# Altium PCB PINTY-FUJI-CARD-PCB-v1.1_2026-11-04.pcbdoc (part 2 of 2)
Units mil, origin at the board's own origin, x right, y up, seen from the top; angles counter-clockwise.
Board outline 3304.99 x 3610.47 mil, 2 copper layers (Top Layer, Bottom Layer); 76 components, 76 nets, 376 pads, 156 vias.
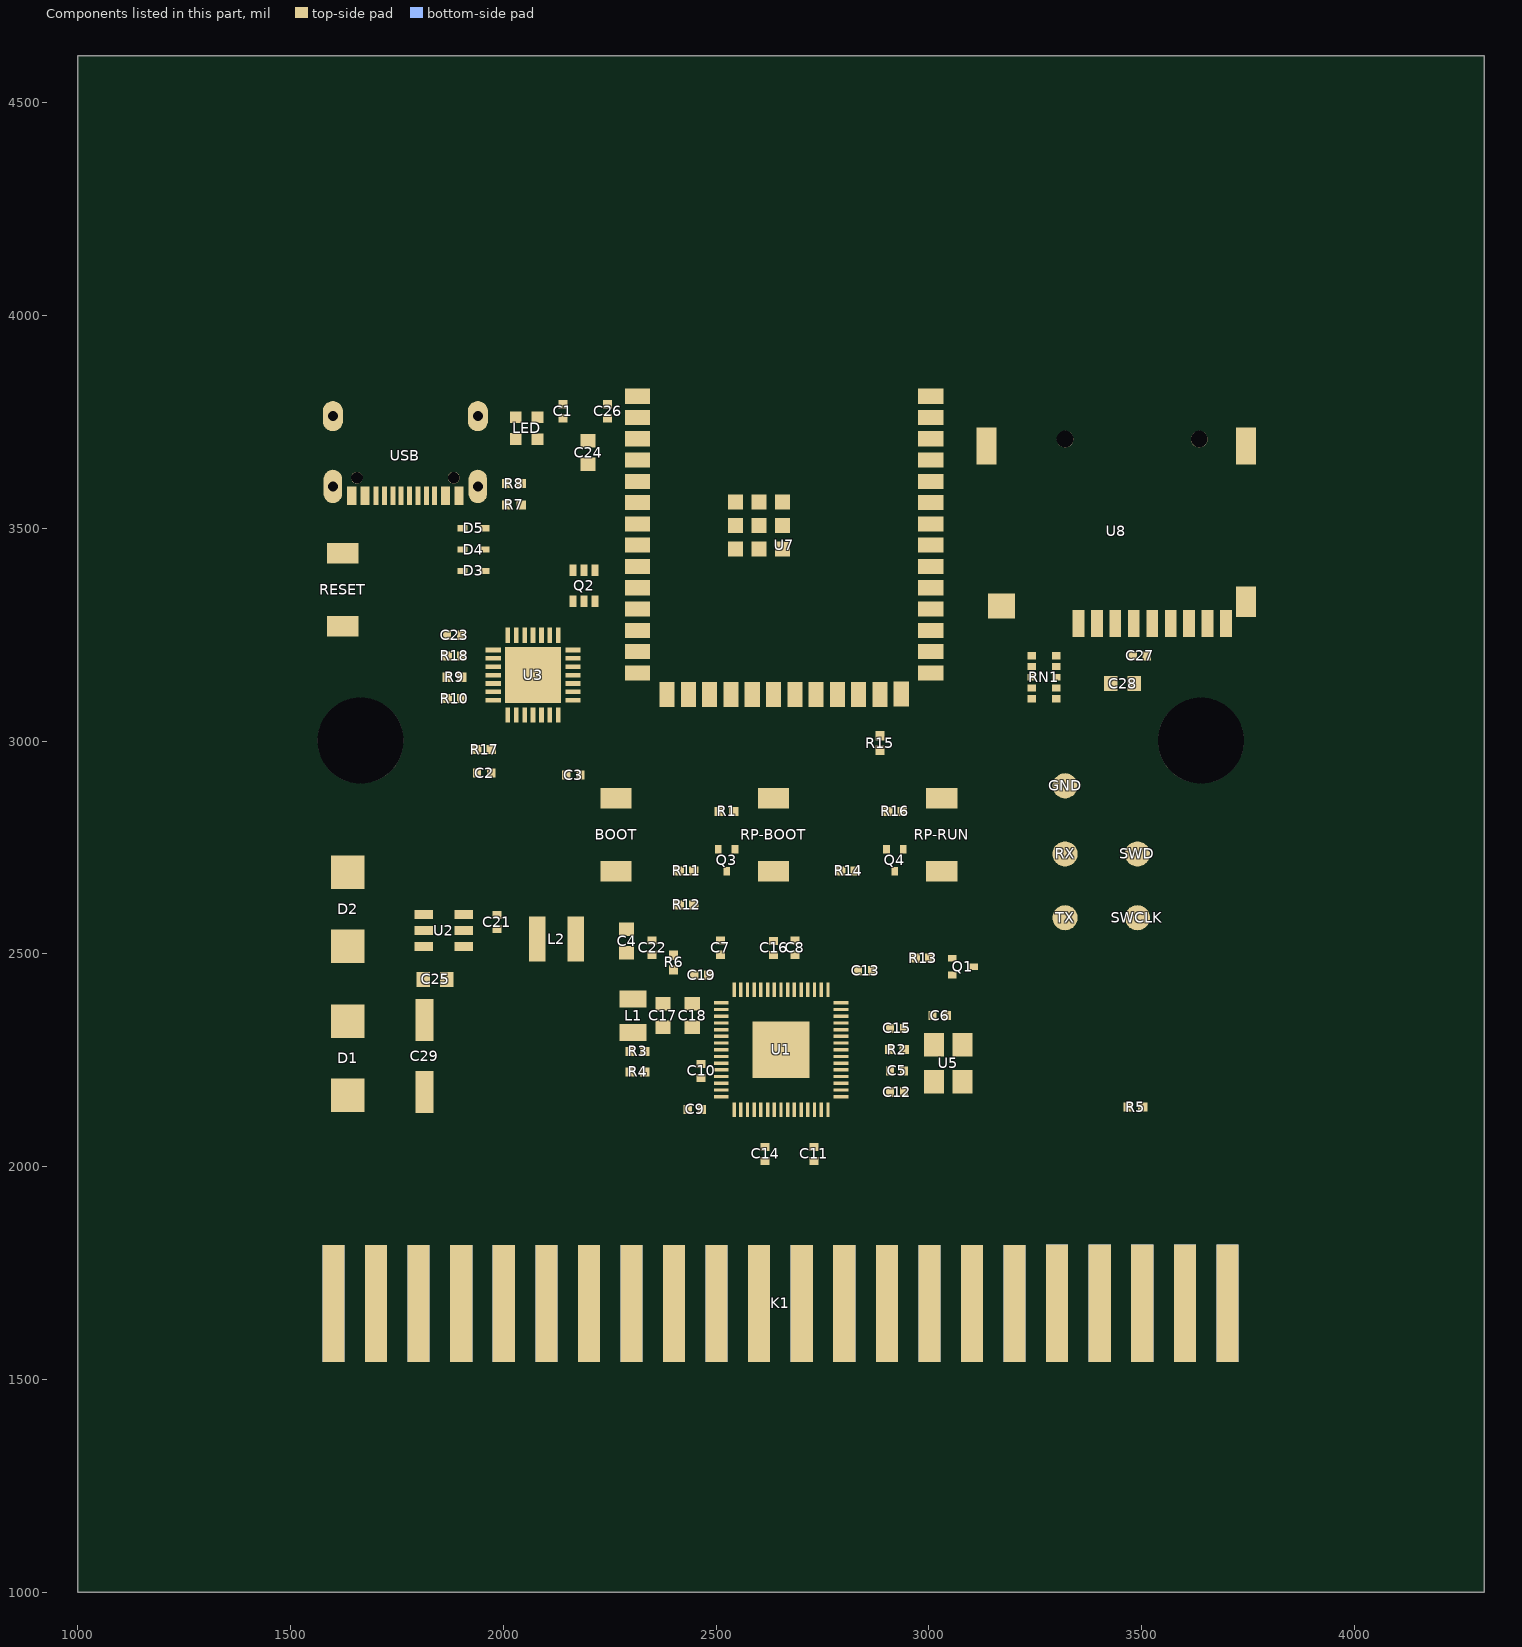
[diagram p2: the components of this part, seen from the top]

## Other copper
Top Layer:
  region net 3V3: 2538.4,2122.49 2538.4,2147.49 2523.4,2139.99 2523.4,2129.99
  region net GPIO11: 2766.73,2140.21 2766.73,2120.23 2778.72,2112.58 2778.72,2123.88
  region net GPIO12: 2810.53,2160.72 2793.74,2160.72 2810.07,2148.73 2821.37,2148.73
  region net 3V3: 2780.76,2389.06 2805.76,2389.06 2798.26,2404.06 2788.26,2404.06
  region net 3V3: 2554.14,2403.09 2554.14,2428.09 2542.36,2420.59 2542.36,2410.59
  region net 3V3: 2546.27,2428.09 2546.27,2403.09 2555.76,2410.59 2555.76,2420.59
  region net 3V3: 2538.4,2412.27 2546.27,2432.86 2534.07,2442.96 2530.16,2432.72
  region net U1_46: 2501.77,2389.06 2521.75,2389.06 2515.76,2401.05 2507.77,2401.05
  region net 3V3: 2521.75,2270.95 2501.77,2270.95 2507.77,2259.19 2515.76,2259.19
  region net 3V3: 2501.77,2263.07 2521.75,2263.07 2515.76,2274.89 2507.77,2274.89
  region net L1_1: 2334.66,2374.68 2314.68,2374.68 2331,2362.7 2342.3,2362.7
  region net 1V1: 2336.5,2328.09 2336.5,2303.09 2345.56,2310.59 2345.56,2320.59
  region net 1V1: 2336.5,2335.31 2336.5,2295.94 2338.97,2305.74 2338.97,2325.43
  region net U5_3: 3020.96,2314.06 2995.96,2314.06 3003.46,2329.06 3013.46,2329.06
  region net U5_3: 2988.49,2287.49 2988.49,2262.49 2973.49,2269.99 2973.49,2279.99
  region net XIN: 3055.42,2207.76 3058.87,2227.44 3048.24,2236.28 3046.56,2226.67
  region net USB_D+: 2343.88,2213 2343.88,2232.98 2350.96,2226.98 2350.96,2218.99
  region net USB_DP: 2287.53,2212.32 2287.53,2233.59 2272.53,2227.99 2272.53,2217.99
  region net USB_D-: 2343.88,2260.8 2343.88,2280.78 2355.87,2274.78 2355.87,2266.79
  region net USB_DM: 2287.53,2260.2 2287.53,2281.46 2272.53,2275.79 2272.53,2265.79
  region net GND: 2788.31,1816.5 2813.31,1816.5 2805.76,1831.5 2795.76,1831.5
  region net K1_A2: 2188.77,1816.5 2213.77,1816.5 2206.27,1831.5 2196.27,1831.5
  region net K1_A3: 2088.77,1816.5 2113.77,1816.5 2106.27,1831.5 2096.27,1831.5
  region net K1_A4: 1888.77,1816.5 1913.77,1816.5 1906.27,1831.5 1896.27,1831.5
  region net K1_A3: 1788.77,1816.5 1813.77,1816.5 1806.27,1831.5 1796.27,1831.5
  region net K1_A2: 1688.77,1816.5 1713.77,1816.5 1706.27,1831.5 1696.27,1831.5
  region net GND: 1588.77,1816.5 1613.77,1816.5 1606.27,1831.5 1596.27,1831.5
  region net CART_RST: 3188.77,1816.5 3213.77,1816.5 3206.27,1831.5 3196.27,1831.5
  region net GND: 2388.77,1816.5 2413.77,1816.5 2406.27,1831.5 2396.27,1831.5
  region net GND: 2687.27,1816.5 2712.27,1816.5 2704.77,1831.5 2694.77,1831.5
  region net GND: 2588.77,1816.5 2613.77,1816.5 2606.27,1831.5 2596.27,1831.5
  region net GND: 2488.77,1816.5 2513.77,1816.5 2506.27,1831.5 2496.27,1831.5
  region net K1_A4: 1988.77,1816.5 2013.77,1816.5 2006.27,1831.5 1996.27,1831.5
  region net AUD: 3488.86,1817.11 3513.86,1817.11 3506.36,1832.11 3496.36,1832.11
  region net GND: 3388.86,1817.11 3413.86,1817.11 3406.36,1832.11 3396.36,1832.11
  region net GND: 3288.86,1817.11 3313.86,1817.11 3306.36,1832.11 3296.36,1832.11
  region net 3V3: 2410.63,2508.17 2389.37,2508.17 2389.97,2524.99 2409.97,2524.99
  region net U1_46: 2410.63,2472.98 2410.63,2453 2412.97,2458.99 2412.97,2466.98
  region net XOUT: 2912.21,2264.37 2896.82,2277.12 2892.48,2265.15 2898.66,2260.03
  region net U5_3: 2953.18,2285.63 2953.18,2264.37 2968.18,2269.99 2968.18,2279.99
  region net U5_3: 3018.3,2344.37 2998.62,2344.37 3003.46,2329.37 3013.46,2329.37
  region net XIN: 2898.62,2235.63 2918.31,2235.63 2912.46,2236.59 2904.47,2236.59
  region net XIN: 2900.62,2235.63 2918.31,2235.63 2922.79,2242.16 2914.31,2244.99
  region net U1_46: 2471.69,2460.63 2491.37,2460.63 2485.56,2468.49 2477.57,2468.49
  region net U1_46: 2491.37,2455.3 2479.32,2439.37 2490.97,2434.89 2495.83,2441.33
  region net 1V1: 2914.28,2314.37 2898.62,2333.86 2893.14,2316.73 2899.44,2308.89
  region net 1V1: 2604.37,2056.38 2625.63,2056.38 2619.97,2069.99 2609.97,2069.99
  region net 3V3: 2898.62,2164.37 2898.62,2185.59 2896.87,2178.09 2896.87,2168.09
  region net 3V3: 2719.37,2050.23 2740.63,2056.38 2720.77,2066.25 2709.8,2063.08
  region net 3V3: 2473.03,2251.38 2475.63,2231.69 2488.19,2251.14 2486.54,2263.63
  region net 3V3: 2476.37,2145.63 2476.37,2124.37 2491.37,2129.99 2491.37,2139.99
  region net 3V3: 2695.63,2488.62 2674.37,2488.62 2679.97,2473.62 2689.97,2473.62
  region net 3V3: 2520.63,2488.62 2499.37,2488.62 2512.9,2479.99 2523.5,2483.52
  region net AUD: 3490.9,2129.37 3513.17,2129.37 3506.36,2114.37 3496.36,2114.37
  region net PWM: 3456.82,2130.01 3456.82,2149.99 3444.83,2143.99 3444.83,2136
  region net VBUS_SNS: 1913.18,3160.63 1890.9,3160.63 1897.07,3175.63 1907.07,3175.63
  region net VBUS: 1856.82,3139.37 1856.82,3160.63 1841.82,3154.99 1841.82,3144.99
  region net CC2: 1996.82,3615.63 2019.09,3615.63 2012.97,3630.63 2002.97,3630.63
  region net CC1: 1996.82,3544.37 1996.82,3565.63 1994.97,3559.99 1994.97,3549.99
  region net VBUS: 1892.6,3492.91 1892.6,3507.08 1877.6,3504.99 1877.6,3494.99
  region net UBRTG_DP: 1892.6,3442.91 1892.6,3457.08 1877.6,3454.99 1877.6,3444.99
  region net UBRTG_DP: 1916.22,3442.91 1892.6,3442.91 1899.37,3440.59 1909.37,3440.59
  region net UBRTG_DM: 1892.6,3392.91 1892.6,3407.08 1877.6,3404.99 1877.6,3394.99
  region net UBRTG_DM: 1916.22,3397.66 1892.6,3392.91 1915.14,3382.14 1926.92,3384.51
  region net VIN: 1659.96,2479.01 1609.96,2479.01 1624.96,2449.01 1644.96,2449.01
  region net VBUS: 1674.37,2716.59 1674.37,2666.59 1704.37,2681.59 1704.37,2701.59
  region net VIN: 1609.96,2380.98 1659.96,2380.98 1644.96,2410.98 1624.96,2410.98
  region net VIN: 1674.37,2369.69 1674.37,2319.69 1704.37,2334.69 1704.37,2354.69
  region net VSYS: 1659.96,2129.01 1609.96,2129.01 1624.96,2099.01 1644.96,2099.01
  region net VIN: 1796.69,2457.72 1828.19,2457.72 1822.77,2487.72 1802.77,2487.72
  region net VIN: 1828.19,2422.28 1796.69,2422.28 1802.47,2392.28 1822.47,2392.28
  region net 3V3: 1910.87,3259.29 1910.87,3238.03 1925.87,3243.68 1925.87,3253.68
  region net R16_1: 2925.9,2824.37 2948.17,2824.37 2942.07,2809.37 2932.07,2809.37
  region net RUN_CTL: 2891.82,2824.37 2891.82,2845.63 2876.82,2839.99 2876.82,2829.99
  region net 3V3: 2781.82,2684.37 2804.09,2684.37 2802.97,2654.37 2782.97,2654.37
  region net 3V3: 2781.82,2684.37 2804.09,2684.37 2802.97,2654.37 2782.97,2654.37
  region net RUN: 2838.17,2705.63 2838.17,2684.37 2853.17,2689.99 2853.17,2699.99
  region net R13_1: 3013.17,2479.7 3013.17,2499.68 3025.16,2493.68 3025.16,2485.69
  region net GPIO20: 2956.82,2480 2956.82,2499.98 2944.83,2493.98 2944.83,2485.99
  region net 3V3: 2435.9,2604.37 2458.18,2604.37 2457.07,2574.37 2437.07,2574.37
  region net 3V3: 2458.18,2604.37 2458.18,2625.63 2488.18,2624.99 2488.18,2604.99
  region net QSPI_SS: 2401.82,2625.63 2424.09,2625.63 2417.97,2640.63 2407.97,2640.63
  region net QSPI_SS: 2401.82,2604.37 2401.82,2625.63 2386.82,2619.99 2386.82,2609.99
  region net QSPI_SS: 2401.82,2684.37 2424.09,2684.37 2417.97,2669.37 2407.97,2669.37
  region net R11_2: 2458.18,2705.63 2458.18,2684.37 2473.18,2689.99 2473.18,2699.99
  region net R1_1: 2532.16,2824.37 2553.18,2824.37 2549.66,2809.37 2539.66,2809.37
  region net BOOTSEL_CTL: 2496.82,2824.37 2496.82,2845.63 2481.82,2839.99 2481.82,2829.99
  region net S3_TXD: 2974.96,3647.49 2974.96,3672.49 2959.96,3664.99 2959.96,3654.99
  region net S3_RXD: 2974.96,3597.69 2974.96,3622.69 2959.96,3615.19 2959.96,3605.19
  region net SD_CS: 3034.02,3522.69 3034.02,3497.69 3049.02,3505.19 3049.02,3515.19
  region net SD_MISO: 3034.02,3472.69 3034.02,3447.69 3049.02,3455.19 3049.02,3465.19
  region net SD_SCK: 3034.02,3422.69 3034.02,3397.69 3045.16,3405.19 3045.16,3415.19
  region net SD_MOSI: 3034.02,3372.69 3034.02,3347.69 3049.02,3355.19 3049.02,3365.19
  region net S3_IO0: 3016.96,3142.47 2991.96,3142.47 2999.46,3127.47 3009.46,3127.47
  region net S3_IO0: 3034.02,3170.18 3034.02,3150.2 3046,3156.19 3046,3164.18
  region net LED_STRIP: 2897.47,3080.27 2872.47,3080.27 2879.97,3065.27 2889.97,3065.27
  region net USB_DP: 2342.47,3142.47 2317.47,3142.47 2324.97,3127.47 2334.97,3127.47
  region net USB_DM: 2345.04,3222.49 2345.04,3197.49 2360.04,3204.99 2360.04,3214.99
  region net BOOTSEL_CTL: 2345.04,3622.69 2345.04,3597.69 2354.77,3605.19 2354.77,3615.19
  region net RUN_CTL: 2345.04,3672.69 2345.04,3647.69 2360.04,3655.19 2360.04,3665.19
  region net S3_EN: 2285.98,3697.69 2285.98,3722.69 2270.98,3715.19 2270.98,3705.19
  region net 3V3: 2285.98,3742.47 2285.98,3777.91 2255.98,3768.49 2255.98,3748.49
  region net UART_RTS: 2223.86,3387.43 2207.32,3387.43 2210.56,3375.59 2220.56,3375.59
  region net S3_EN: 2223.86,3341.28 2223.86,3316.28 2228.77,3323.78 2228.77,3333.78
  region net UART_RTS: 2181.73,3342.56 2198.27,3342.56 2194.97,3349.99 2184.97,3349.99
  region net UART_RTS: 2198.27,3315 2181.73,3315 2184.97,3300 2194.97,3300
  region net UART_DTR: 2172.68,3315 2156.14,3315 2158.57,3300 2168.57,3300
  region net UART_DTR: 2156.14,3342.56 2172.68,3342.56 2169.37,3357.56 2159.37,3357.56
  region net S3_IO0: 2156.14,3414.99 2172.68,3414.99 2169.37,3429.99 2159.37,3429.99
  region net UART_DTR: 2198.27,3387.43 2181.73,3387.43 2184.97,3384.99 2194.97,3384.99
  region net UART_DTR: 2151.07,3219.56 2176.07,3219.56 2168.57,3234.56 2158.57,3234.56
  region net S3_RXD: 2181.41,3180.19 2181.41,3169.17 2189.66,3170.69 2189.66,3178.68
  region net S3_TXD: 2181.41,3160.51 2181.41,3149.49 2196.41,3149.99 2196.41,3159.99
  region net UART_RTS: 2181.41,3140.82 2181.41,3129.8 2196.41,3130.29 2196.41,3140.29
  region net VBUS_SNS: 1958.59,3208.54 1958.59,3219.56 1943.59,3219.09 1943.59,3209.09
  region net 3V3: 2016.45,3261.09 2016.45,3236.09 2030.67,3243.59 2030.67,3253.59
  region net 3V3: 2005.43,3236.09 2005.43,3261.09 1990.43,3253.59 1990.43,3243.59
  region net 3V3: 2025.12,3236.09 2025.12,3261.09 2010.96,3253.59 2010.96,3243.59
  region net UBRTG_DM: 2044.8,3266.41 2055.82,3266.41 2055.27,3281.41 2045.27,3281.41
  region net UBRTG_DP: 2064.49,3266.41 2075.51,3266.41 2074.97,3281.41 2064.97,3281.41
  region net U8_8: 3667.07,3244.83 3642.07,3244.83 3649.57,3229.83 3659.57,3229.83
  region net SD_MISO: 3622.47,3244.83 3597.48,3244.83 3604.97,3229.83 3614.97,3229.83
  region net SD_MISO: 3598.77,3307.83 3623.77,3307.83 3616.27,3322.83 3606.27,3322.83
  region net SD_SCK: 3512.16,3307.83 3537.16,3307.83 3529.66,3322.83 3519.66,3322.83
  region net 3V3: 3495.11,3244.83 3467.56,3244.83 3468.46,3214.83 3488.46,3214.83
  region net SD_MOSI: 3450.56,3244.83 3425.56,3244.83 3433.06,3229.83 3443.06,3229.83
  region net SD_MOSI: 3425.56,3307.83 3450.56,3307.83 3443.06,3322.83 3433.06,3322.83
  region net SD_CS: 3382.27,3307.83 3407.27,3307.83 3399.77,3322.83 3389.77,3322.83
  region net SD_CS: 3407.27,3244.83 3382.27,3244.83 3389.77,3229.83 3399.77,3229.83
  region net U8_1: 3363.86,3244.83 3338.86,3244.83 3346.36,3229.83 3356.36,3229.83
  region net R16_1: 2947.56,2735.55 2931.81,2735.55 2932.36,2727.89 2942.36,2727.89
  region net R16_1: 2947.56,2735.55 2931.81,2735.55 2932.36,2727.89 2942.36,2727.89
  region net R16_1: 2931.81,2755.63 2947.56,2755.63 2942.07,2770.63 2932.07,2770.63
  region net RUN: 2912.12,2684.37 2912.12,2704.45 2897.12,2699.39 2897.12,2689.39
  region net RUN: 2927.87,2704.45 2927.87,2684.37 2942.87,2689.3 2942.87,2699.3
  region net R1_1: 2536.81,2755.63 2552.56,2755.63 2549.66,2770.63 2539.66,2770.63
  region net R11_2: 2532.87,2704.45 2532.87,2684.37 2547.87,2689.39 2547.87,2699.39
  region net R11_2: 2517.13,2684.37 2517.13,2704.45 2502.13,2699.99 2502.13,2689.99
  region net R13_1: 3044.37,2481.81 3044.37,2497.56 3032.38,2493.68 3032.38,2485.69
  region net CART_RST: 3115.63,2477.87 3115.63,2462.12 3119.97,2464.99 3119.97,2474.99
  region net 3V3: 2129.37,3748.62 2129.37,3768.3 2114.37,3763.49 2114.37,3753.49
  region net 3V3: 1926.82,2990.63 1926.82,2969.37 1911.82,2974.99 1911.82,2984.99
  region net S3_EN: 1960.9,2990.63 1983.18,2990.63 1977.07,2991.99 1967.07,2991.99
  region net S3_EN: 1983.18,2969.37 1960.9,2969.37 1966.83,2954.37 1976.83,2954.37
  region net S3_IO0: 2191.38,2930.63 2191.38,2909.37 2206.38,2914.99 2206.38,2924.99
  region net S3_EN: 1961.69,2935.63 1981.38,2935.63 1976.8,2950.63 1966.8,2950.63
  region net R11_2: 2598.39,2681.89 2598.39,2706.89 2583.39,2699.39 2583.39,2689.39
  region net S3_EN: 1659.72,3457.49 1659.72,3432.49 1674.72,3439.99 1674.72,3449.99
  region net S3_IO0: 2254.98,2890.23 2274.96,2890.23 2268.96,2902.22 2260.97,2902.22
  region net RUN: 2993.39,2681.62 2993.39,2706.62 2978.39,2699.17 2978.39,2689.17
  region net VBUS: 1686.36,3554.82 1664.71,3554.82 1665.47,3534.99 1685.47,3534.99
  region net CC2: 1695.22,3598.13 1707.03,3598.13 1706.17,3613.13 1696.17,3613.13
  region net UBRTG_DP: 1746.41,3554.82 1734.6,3554.82 1735.47,3539.82 1745.47,3539.82
  region net UBRTG_DM: 1766.09,3554.82 1754.28,3554.82 1755.16,3539.82 1765.16,3539.82
  region net UBRTG_DM: 1754.28,3598.13 1766.09,3598.13 1765.16,3613.13 1755.16,3613.13
  region net UBRTG_DP: 1785.78,3554.82 1773.97,3554.82 1774.86,3539.82 1784.86,3539.82
  region net UBRTG_DM: 1793.65,3598.13 1805.46,3598.13 1804.57,3613.13 1794.57,3613.13
  region net CC1: 1813.33,3598.13 1825.14,3598.13 1824.17,3613.13 1814.17,3613.13
  region net VBUS: 1875.34,3554.82 1853.69,3554.82 1854.97,3534.99 1874.97,3535.11
  region net 3V3: 3468.62,3189.37 3468.62,3210.63 3449.97,3209.99 3449.97,3189.99
  region net 3V3: 2094.37,3770.99 2094.37,3746.81 2109.37,3753.49 2109.37,3763.49
  region net LED_2: 2092.58,3695.63 2067.58,3695.63 2075.21,3680.63 2085.21,3680.63
  region net 3V3: 3443.19,3117.28 3411.69,3117.28 3417.47,3087.28 3437.47,3087.28
  region net 3V3: 3411.69,3152.71 3443.19,3152.71 3437.47,3177.39 3417.47,3177.39
  region net 3V3: 2272.28,2486.69 2272.28,2518.19 2257.57,2512.39 2257.57,2492.39
  region net 3V3: 2307.72,2518.19 2307.72,2486.69 2337.72,2488.49 2337.72,2508.49
  region net 3V3: 1800.27,2603.23 1825.27,2603.23 1817.77,2617.79 1807.77,2617.79
  region net VIN: 1834.41,2544.17 1791.1,2544.17 1802.77,2514.17 1822.77,2514.17
  region net VIN: 1791.1,2528.43 1834.41,2528.43 1822.77,2554.99 1802.77,2554.99
  region net VIN: 1834.41,2506.77 1791.1,2506.77 1802.77,2476.77 1822.77,2476.77
  region net U2_5: 1928.9,2565.83 1928.9,2544.17 1958.9,2544.99 1958.9,2564.99
  region net 3V3: 2181.77,3689.56 2181.77,3721.06 2180.36,3715.29 2180.36,3695.29
  region net 3V3: 2181.77,3721.06 2217.2,3721.06 2209.46,3739.49 2189.46,3739.49
  region net 3V3: 2181.77,3721.06 2217.2,3721.06 2209.46,3735.49 2189.46,3735.49
  region net 3V3: 2189.96,2559.99 2189.96,2509.99 2219.96,2524.99 2219.96,2544.99
  region net 3V3: 2150.59,2588.15 2189.96,2588.15 2180.27,2609.79 2160.27,2609.79
  region net U2_5: 2060.04,2509.99 2060.04,2559.99 2044.97,2544.99 2044.97,2524.99
  region net VBUS_SNS: 1913.18,3210.63 1913.18,3189.37 1924.97,3194.99 1924.97,3204.99
  region net VBUS_SNS: 1913.18,3189.37 1890.9,3189.37 1897.07,3174.37 1907.07,3174.37
  region net VIN: 1793.35,2393.86 1836.66,2393.86 1822.47,2423.86 1802.47,2423.86
  region net VIN: 1793.35,2319.69 1793.35,2369.69 1763.35,2354.69 1763.35,2334.69
  region net LED_STRIP: 2895.63,3023.17 2874.37,3023.17 2879.97,3038.17 2889.97,3038.17
  region net LED_2: 2874.37,2967.49 2874.37,2989.09 2859.37,2984.99 2859.37,2974.99
  region net 3V3: 2823.61,2449.82 2823.61,2471.08 2819.97,2464.99 2819.97,2454.99
  region net 1V1: 2645.63,2487.6 2624.37,2487.6 2629.97,2472.6 2639.97,2472.6
  region net 3V3: 2461.69,2343.19 2461.69,2325.39 2476.69,2332.89 2476.69,2342.89
  region net 1V1: 2392.72,2334.74 2392.72,2311.69 2407.72,2300.17 2407.72,2314.31
  region net 1V1: 2357.28,2314.7 2357.28,2339.7 2345.56,2322.63 2349.08,2312.04
  region net U8_8: 3231.41,3191.53 3231.41,3209.24 3219.42,3204.17 3219.42,3196.18
  region net 3V3: 3288.69,3191.53 3288.69,3209.24 3280.36,3204.38 3280.36,3196.39
  region net U8_1: 3308.58,3183.07 3308.58,3167.32 3315.16,3170.19 3315.16,3180.19
  region net SD_CS: 3308.58,3157.87 3308.58,3142.12 3323.58,3144.99 3323.58,3154.99
  region net S3_IO0: 3231.41,3116.92 3231.41,3132.67 3219.42,3128.78 3219.42,3120.79
  region net SD_MOSI: 3308.58,3132.67 3308.58,3116.92 3323.58,3119.79 3323.58,3129.79
  region net 3V3: 3251.3,3108.47 3251.3,3090.75 3254.57,3095.59 3254.57,3103.58
  region net 3V3: 3251.3,3090.75 3231.41,3090.75 3236.36,3075.75 3246.36,3075.75
  region net SD_MISO: 3308.58,3108.47 3308.58,3090.75 3323.58,3094.59 3323.58,3104.59
  region net CP_RST: 1913.18,3089.37 1913.18,3110.63 1924.97,3104.99 1924.97,3094.99
  region net 3V3: 1879.09,3089.37 1856.82,3089.37 1862.97,3074.37 1872.97,3074.37
  region net S3_EN: 2269.14,3701.91 2250.83,3701.94 2254.97,3693.39 2264.97,3693.37
  region net S3_EN: 2268.17,3700.94 2267.96,3719.24 2276.55,3715.19 2276.67,3705.19
  region net S3_EN: 2001.93,3340.84 2001.92,3359.14 1993.38,3354.99 1993.38,3344.99
  region net UBRTG_DP: 1737.18,3494.24 1724.22,3507.18 1733.2,3510.29 1740.27,3503.22
  region net UBRTG_DP: 1822.18,3495.74 1809.21,3482.82 1818.19,3479.7 1825.27,3486.76
  region net UBRTG_DP: 1810.74,3507.18 1797.82,3494.21 1794.7,3503.18 1801.76,3510.27
  region net VBUS: 1814.14,3141.91 1795.83,3141.94 1794.97,3133.4 1814.97,3133.36
  region net VBUS: 1813.07,3159.14 1813.06,3140.84 1821.61,3144.99 1821.62,3154.99
  region net U8_8: 3206.01,3193.3 3205.89,3206.8 3212.21,3204.1 3212.28,3196.11
  region net U8_8: 3661.53,3206.18 3648.05,3205.71 3649.57,3212.06 3659.57,3212.41
  region net LED_2: 2087.27,3646.02 2073.77,3645.88 2075.46,3652.19 2085.46,3652.29
  region net LED_2: 2085.95,2986.74 2085.94,2973.24 2092.24,2974.99 2092.25,2984.99
  region net SD_MISO: 3616.73,3155.96 3603.24,3155.93 3604.97,3162.23 3614.97,3162.26
  region net 3V3: 2119.05,2633.24 2119.04,2646.74 2112.75,2644.99 2112.75,2634.99
  region net 3V3: 1951.73,3255.96 1950.07,3242.57 1955.74,3243.59 1956.98,3253.59
  region net 3V3: 1939.8,3242.65 1938.36,3256.07 1932.28,3253.68 1933.36,3243.68
  region net SWCLK: 3496.74,2525.95 3483.25,2525.95 3486,2532.24 3493.99,2532.24
  region net SWD: 3496.74,2685.95 3483.25,2685.95 3486,2692.24 3493.99,2692.24
  region net GPIO16: 3326.74,2525.95 3313.25,2525.95 3316,2532.24 3323.99,2532.24
  region net GPIO17: 3326.74,2685.95 3313.25,2685.95 3316,2692.24 3323.99,2692.24
  region net GPIO17: 2939.05,2453.24 2939.04,2466.74 2934.96,2463.98 2934.97,2455.99
  region net GPIO16: 2942.93,2426.24 2936.57,2438.14 2932.23,2432.9 2936.17,2425.54
  region net SD_MISO: 3344.28,3093.05 3343.82,3106.54 3337.59,3104.59 3337.92,3094.59
  region net RUN: 2859.05,2688.24 2859.04,2701.74 2852.75,2699.99 2852.75,2689.99
  region net RUN: 2871.28,2701.44 2870.6,2687.96 2876.98,2689.39 2877.48,2699.39
  region net RUN: 2866.73,2374.03 2853.23,2374.07 2855.97,2370 2863.96,2369.97
  region net 3V3: 1870.95,2986.74 1870.94,2973.24 1877.24,2974.99 1877.25,2984.99
  region net 3V3: 1872.98,2984.13 1859.89,2987.4 1862.97,2993.13 1872.97,2990.63
  region net USB_DP: 2336.73,3045.96 2323.24,3045.93 2324.97,3052.23 2334.97,3052.26
  region net USB_DM: 2384.05,3203.24 2384.04,3216.74 2377.75,3214.99 2377.75,3204.99
  region net RUN_CTL: 2860.95,2841.74 2860.94,2828.24 2867.24,2829.99 2867.25,2839.99
  region net RUN_CTL: 2451.73,3525.96 2438.24,3525.93 2439.97,3532.23 2449.97,3532.26
  region net BOOTSEL_CTL: 2401.73,3525.96 2388.24,3525.93 2389.97,3532.23 2399.97,3532.26
  region net BOOTSEL_CTL: 2470.95,2841.74 2470.94,2828.24 2477.24,2829.99 2477.25,2839.99
  region net S3_IO0: 2271.73,2914.03 2258.24,2914.06 2260.97,2907.76 2268.96,2907.74
  region net S3_IO0: 2259.05,2913.24 2259.04,2926.74 2252.75,2924.99 2252.75,2914.99
  region net S3_IO0: 2270.95,2926.74 2270.94,2913.24 2277.24,2914.99 2277.25,2924.99
  region net S3_IO0: 2171.14,3449.02 2157.64,3449.07 2159.37,3442.77 2169.37,3442.73
  region net S3_TXD: 2940.95,3666.74 2940.94,3653.24 2947.24,3654.99 2947.25,3664.99
  region net S3_RXD: 2941.05,3603.34 2940.84,3616.83 2947.16,3615.19 2947.32,3605.19
  region net S3_TXD: 2220.55,3156.02 2211.02,3165.57 2207.8,3159.88 2214.86,3152.81
  region net S3_RXD: 2226.73,3214.03 2213.24,3214.06 2215.97,3207.76 2223.96,3207.74
  region net SD_CS: 3401.63,3333.92 3388.14,3334.17 3389.77,3327.84 3399.77,3327.66
  region net SD_CS: 3389.05,3503.44 3389.05,3516.93 3382.75,3515.19 3382.75,3505.19
  region net QSPI_SS: 2305.95,2621.74 2305.94,2608.24 2312.24,2609.99 2312.25,2619.99
  region net VBUS: 1871.73,3529.03 1858.24,3529.06 1859.97,3522.76 1869.97,3522.74
  region net QSPI_SS: 2171.73,2379.03 2158.24,2379.06 2159.97,2372.76 2169.97,2372.74
  region net USB_DP: 2221.73,2379.03 2208.24,2379.06 2209.97,2372.76 2219.97,2372.74
  region net USB_DM: 2256.73,2379.03 2243.24,2379.06 2244.97,2372.76 2254.97,2372.74
  region net SWCLK: 2945.55,2371.02 2936.02,2380.57 2933.5,2374.17 2939.15,2368.52
  region net SWD: 2945.55,2401.02 2936.02,2410.57 2933.5,2404.17 2939.15,2398.52
  region net GPIO06: 3239.54,1962.15 3238.58,1948.69 3232.42,1950.87 3233.14,1960.87
  region net GPIO06: 2879.6,1949.12 2879.6,1962.61 2885.9,1960.87 2885.9,1950.87
  region net GPIO05: 3095.9,1928.96 3095.89,1942.46 3089.6,1940.71 3089.6,1930.71
  region net GPIO05: 2859.46,1928.96 2859.46,1942.45 2865.75,1940.71 2865.75,1930.71
  region net GPIO04: 2895.42,1906.28 2895.42,1919.77 2889.13,1918.03 2889.13,1908.03
  region net GPIO04: 2836.78,1906.28 2836.78,1919.77 2843.07,1918.03 2843.07,1908.03
  region net GPIO05: 2671.53,1995.09 2662.01,1985.52 2659.48,1991.92 2665.12,1997.58
  region net GPIO04: 2643.71,1990.8 2630.22,1990.8 2632.97,1997.09 2640.96,1997.09
  region net GPIO03: 2571.73,1995.96 2558.24,1995.93 2560.97,2002.23 2568.96,2002.25
  region net GPIO06: 2701.8,1995.08 2692.24,1985.56 2689.74,1991.96 2695.4,1997.6
  region net GPIO07: 2696.73,2058.07 2687.2,2048.52 2684.68,2054.92 2690.33,2060.57
  region net GPIO08: 2798.6,2048.31 2798.55,2034.81 2792.26,2037.59 2792.29,2045.58
  region net GPIO09: 2798.6,2073.51 2798.55,2060.01 2792.26,2062.79 2792.29,2070.78
  region net GPIO10: 2798.6,2098.71 2798.55,2085.21 2792.26,2087.99 2792.29,2095.98
  region net GPIO11: 2798.6,2110.36 2798.55,2123.85 2792.26,2121.08 2792.29,2113.09
  region net GPIO12: 2595.95,1971.74 2595.94,1958.24 2602.24,1960.99 2602.25,1968.98
  region net GPIO13: 2506.3,1950.02 2504.73,1936.62 2511.3,1938.59 2512.24,1946.58
  region net GPIO21: 3200.54,2093.98 3191.02,2084.41 3188.5,2090.8 3194.14,2096.47
  region net GPIO14: 2305.95,1931.74 2305.94,1918.24 2312.24,1920.99 2312.25,1928.98
  region net GPIO00: 2111.61,2013.22 2102.1,2022.8 2108.51,2025.28 2114.14,2019.61
  region net GPIO01: 2212.4,2015.78 2202.86,2025.31 2209.25,2027.83 2214.91,2022.18
  region net GPIO02: 2408.93,1985.52 2399.4,1995.08 2405.8,1997.57 2411.45,1991.92
  region net GPIO15: 2842.31,2213.58 2836.81,2201.26 2832.03,2205.99 2835.59,2213.98
  region net GPIO22: 2735.55,2486.02 2726.02,2495.57 2723.5,2489.18 2729.15,2483.52
  region net GPIO27: 2575.95,2476.74 2575.94,2463.24 2579.96,2465.99 2579.97,2473.98
  region net GPIO26: 2596.73,2494.03 2583.24,2494.06 2585.97,2487.76 2593.96,2487.74
  region net 1V1: 2878.53,2282.85 2866.1,2288.1 2869.79,2293.38 2879.73,2289.18
  region net 1V1: 2867.4,2271.38 2861.77,2283.64 2856.57,2279.89 2861.16,2269.89
  region net 1V1: 2641.73,2475.96 2628.24,2475.93 2629.97,2482.23 2639.97,2482.26
  region net 1V1: 2642.57,2465.15 2629.24,2463.09 2631.87,2457.12 2641.87,2458.66
  region net 1V1: 2415.54,2308.98 2406.02,2299.41 2402.79,2305.09 2409.84,2312.18
  region net 1V1: 2420.95,2306.74 2420.94,2293.24 2427.24,2294.99 2427.25,2304.99
  region net 1V1: 2621.73,2064.03 2608.24,2064.06 2609.97,2057.76 2619.97,2057.74
  region net 1V1: 2623.71,2072.23 2611.69,2078.36 2615.56,2083.46 2625.56,2078.35
  region net SWD: 3512.13,2715.47 3467.84,2715.44 3486,2694.78 3493.99,2694.79
  region net SWCLK: 3512.13,2565.47 3467.84,2565.44 3486,2544.78 3493.99,2544.79
  region net GPIO16: 3342.13,2565.47 3297.84,2565.44 3316,2544.78 3323.99,2544.79
  region net GPIO17: 3342.13,2715.47 3297.84,2715.44 3316,2694.78 3323.99,2694.79
  region net 3V3: 2546.73,2431.32 2550,2420 2550,2388.68 2535,2390 2500,2488.68 2521.73,2491.32
  region net 1V1: 2360,2345 2400.7,2345 2422.72,2306.14 2341.22,2305.44
  pour cut-out: 2980,2320 2991.81,2331.81 3113.86,2331.81 3125.67,2320 3125.67,2166.45 3113.86,2154.64 2991.81,2154.64 2980,2166.45
  region net L1_1: 2360,2350 2310,2350 2282.75,2395.39 2334.09,2395.71
Bottom Layer:
  region net GPIO01: 2190.96,1816.5 2215.96,1816.5 2208.46,1831.5 2198.46,1831.5
  region net GPIO09: 3188.77,1816.5 3213.77,1816.5 3206.27,1831.5 3196.27,1831.5
  region net GPIO05: 3088.77,1816.5 3113.77,1816.5 3106.27,1831.5 3096.27,1831.5
  region net GPIO10: 2988.77,1816.5 3013.77,1816.5 3006.27,1831.5 2996.27,1831.5
  region net GPIO04: 2888.77,1816.5 2913.77,1816.5 2906.27,1831.5 2896.27,1831.5
  region net GPIO11: 2788.83,1816.5 2813.83,1816.5 2806.34,1831.5 2796.34,1831.5
  region net GPIO03: 2688.77,1816.5 2713.77,1816.5 2706.27,1831.5 2696.27,1831.5
  region net GPIO12: 2588.77,1816.5 2613.77,1816.5 2606.27,1831.5 2596.27,1831.5
  region net GPIO13: 2487.07,1816.5 2512.07,1816.5 2504.57,1831.5 2494.57,1831.5
  region net GPIO02: 2387.47,1816.5 2412.47,1816.5 2404.97,1831.5 2394.97,1831.5
  region net GPIO14: 2287.47,1816.5 2312.47,1816.5 2304.97,1831.5 2294.97,1831.5
  region net GPIO00: 2088.77,1816.5 2113.77,1816.5 2106.27,1831.5 2096.27,1831.5
  region net GPIO15: 1988.77,1816.5 2013.77,1816.5 2006.27,1831.5 1996.27,1831.5
  region net VSYS: 1576.27,1816.5 1626.27,1816.5 1611.27,1846.5 1591.27,1846.5
  region net GPIO22: 1883.77,1816.5 1908.77,1816.5 1901.27,1831.5 1891.27,1831.5
  region net GPIO27: 1788.77,1816.5 1813.77,1816.5 1806.27,1831.5 1796.27,1831.5
  region net GPIO26: 1688.77,1816.5 1713.77,1816.5 1706.27,1831.5 1696.27,1831.5
  region net GND: 3688.86,1817.11 3713.86,1817.11 3706.36,1832.11 3696.36,1832.11
  region net GPIO21: 3591.37,1817.11 3611.35,1817.11 3605.36,1829.09 3597.37,1829.09
  region net GPIO07: 3488.86,1817.11 3513.86,1817.11 3506.36,1832.11 3496.36,1832.11
  region net GPIO08: 3388.86,1817.11 3413.86,1817.11 3406.36,1832.11 3396.36,1832.11
  region net GPIO06: 3288.86,1817.11 3313.86,1817.11 3306.36,1832.11 3296.36,1832.11
  region net S3_EN: 2251.92,3700.84 2251.92,3719.15 2243.38,3715 2243.38,3705
  region net S3_EN: 2022.18,3349.23 2009.23,3362.18 2018.21,3365.28 2025.28,3358.21
  region net UBRTG_DP: 1733.07,3485.84 1733.07,3504.15 1741.61,3500 1741.61,3490
  region net UBRTG_DP: 1801.92,3485.84 1801.92,3504.15 1793.38,3500 1793.38,3490
  region net VBUS: 1814.14,3158.08 1795.83,3158.05 1794.97,3166.59 1814.97,3166.63
  region net U8_8: 3205.95,3193.25 3205.95,3206.74 3212.24,3203.99 3212.24,3196
  region net U8_8: 3649.05,3193.25 3649.05,3206.74 3642.75,3203.99 3642.75,3196
  region net LED_2: 2087.33,3634.05 2073.84,3634.05 2075.58,3627.75 2085.58,3627.75
  region net LED_2: 2087.02,2985.62 2073.54,2986.26 2075.58,2992.47 2085.58,2991.99
  region net SD_MISO: 3604.05,3143.25 3604.05,3156.74 3597.75,3155 3597.75,3145
  region net 3V3: 2119.05,2663.25 2119.05,2676.74 2112.75,2675 2112.75,2665
  region net 3V3: 1945.56,3241.02 1936.02,3250.56 1932.8,3244.87 1939.87,3237.8
  region net SWCLK: 3496.74,2514.05 3483.25,2514.05 3486,2507.75 3493.99,2507.75
  region net SWD: 3490.56,2671.02 3481.02,2680.56 3478.51,2674.16 3484.16,2668.51
  region net GPIO16: 3320.56,2511.02 3311.02,2520.56 3308.51,2514.16 3314.16,2508.51
  region net GPIO17: 3320.56,2671.02 3311.02,2680.56 3308.51,2674.16 3314.16,2668.51
  region net GPIO17: 2950.95,2453.25 2950.95,2466.74 2957.24,2463.99 2957.24,2456
  region net GPIO16: 2950.95,2428.25 2950.95,2441.74 2957.24,2438.99 2957.24,2431
  region net SD_MISO: 3358.97,3099.39 3349.47,3108.98 3355.18,3112.17 3362.22,3105.06
  region net RUN: 2871.74,2689.05 2858.25,2689.05 2861,2682.75 2868.99,2682.75
  region net RUN: 2868.59,2382.67 2856.27,2388.18 2861,2392.96 2868.99,2389.39
  region net 3V3: 1871.74,2974.05 1858.25,2974.05 1860,2967.75 1870,2967.75
  region net 3V3: 1871.74,2985.95 1858.25,2985.95 1860,2992.24 1870,2992.24
  region net USB_DP: 2336.73,3034.03 2323.24,3034.06 2324.97,3027.76 2334.97,3027.74
  region net USB_DM: 2396.73,3204.03 2383.24,3204.06 2384.97,3197.76 2394.97,3197.74
  region net RUN_CTL: 2849.05,2828.24 2849.04,2841.74 2842.75,2839.99 2842.75,2829.99
  region net RUN_CTL: 2451.73,3514.03 2438.24,3514.06 2439.97,3507.76 2449.97,3507.74
  region net BOOTSEL_CTL: 2401.74,3514.05 2388.25,3514.05 2390,3507.75 2400,3507.75
  region net BOOTSEL_CTL: 2471.74,2840.95 2458.25,2840.95 2460,2847.24 2470,2847.24
  region net S3_IO0: 2265.56,2928.97 2256.02,2919.43 2252.8,2925.12 2259.87,2932.19
  region net S3_IO0: 2171.16,3449.04 2157.67,3449.05 2159.41,3442.75 2169.41,3442.75
  region net S3_TXD: 2929.05,3653.24 2929.04,3666.74 2922.75,3664.99 2922.75,3654.99
  region net S3_RXD: 2929.05,3603.24 2929.04,3616.74 2922.75,3614.99 2922.75,3604.99
  region net S3_TXD: 2220.56,3173.97 2211.02,3164.43 2207.8,3170.12 2214.87,3177.19
  region net S3_RXD: 2226.73,3225.96 2213.24,3225.93 2214.97,3232.23 2224.97,3232.26
  region net SD_CS: 3401.74,3345.95 3388.25,3345.95 3390,3352.24 3400,3352.24
  region net SD_CS: 3401.74,3504.24 3388.25,3504.24 3390,3497.94 3400,3497.94
  region net QSPI_SS: 2306.73,2609.03 2293.24,2609.06 2294.97,2602.76 2304.97,2602.74
  region net QSPI_SS: 2173.98,2384.44 2164.42,2393.97 2170.11,2397.2 2177.19,2390.13
  region net USB_DP: 2223.98,2384.44 2214.42,2393.97 2220.11,2397.2 2227.19,2390.13
  region net USB_DM: 2258.98,2384.44 2249.42,2393.97 2255.11,2397.2 2262.19,2390.13
  region net SWCLK: 2950.95,2373.25 2950.95,2386.74 2957.24,2383.99 2957.24,2376
  region net SWD: 2950.95,2403.25 2950.95,2416.74 2957.24,2413.99 2957.24,2406
  region net GPIO06: 3253.98,1955.54 3244.41,1946.02 3250.09,1942.79 3257.18,1949.84
  region net GPIO06: 2867.72,1962.62 2867.69,1949.13 2861.4,1950.89 2861.42,1960.89
  region net GPIO05: 3108.3,1929.45 3094.83,1930.09 3096.27,1923.72 3106.27,1923.24
  region net GPIO05: 2847.56,1928.96 2847.55,1942.45 2841.26,1940.71 2841.26,1930.71
  region net GPIO04: 2908.12,1907.07 2894.62,1907.08 2896.36,1900.78 2906.36,1900.77
  region net GPIO04: 2824.9,1906.26 2824.85,1919.75 2818.56,1917.99 2818.6,1907.99
  region net GPIO05: 2677.73,1980.16 2664.24,1980.16 2665.98,1973.86 2675.98,1973.86
  region net GPIO04: 2643.71,1978.9 2630.22,1978.9 2631.96,1972.6 2641.96,1972.6
  region net GPIO03: 2570.95,1996.74 2570.94,1983.24 2577.24,1984.99 2577.25,1994.99
  region net GPIO06: 2707.99,1980.18 2694.49,1980.13 2696.27,1973.84 2706.27,1973.88
  region net GPIO07: 2704.93,2051.15 2693.04,2057.53 2697.36,2062.36 2706.57,2057.42
  region net GPIO08: 2810.5,2034.81 2810.45,2048.31 2816.75,2046.59 2816.79,2036.59
  region net GPIO09: 2801.09,2058.42 2796.7,2071.19 2791.13,2068.02 2794.75,2057.5
  region net GPIO10: 2798.6,2098.71 2798.55,2085.21 2792.26,2086.99 2792.3,2096.99
  region net GPIO11: 2798.6,2110.36 2798.55,2123.85 2792.26,2122.09 2792.29,2112.09
  region net GPIO12: 2596.73,1959.03 2583.24,1959.06 2584.97,1952.76 2594.97,1952.74
  region net GPIO13: 2506.33,1938.05 2492.84,1938.09 2494.57,1931.79 2504.57,1931.75
  region net GPIO21: 3205.95,2091.74 3205.94,2078.24 3212.24,2080.99 3212.25,2088.98
  region net GPIO14: 2306.73,1919.03 2293.24,1919.06 2294.97,1912.76 2304.97,1912.74
  region net GPIO00: 2108.67,2007.15 2095.26,2008.66 2096.27,2002.21 2106.27,2001.08
  region net GPIO01: 2210.19,2010.41 2196.7,2010.36 2198.46,2004.07 2208.46,2004.1
  region net GPIO02: 2406.71,1980.15 2393.21,1980.14 2394.97,1973.84 2404.97,1973.86
  region net GPIO15: 2851.73,2199.03 2838.24,2199.06 2839.97,2192.9 2849.97,2192.87
  region net GPIO22: 2729.05,2488.24 2729.04,2501.74 2722.75,2499.99 2722.75,2489.99
  region net GPIO27: 2564.05,2463.24 2564.04,2476.74 2557.75,2474.99 2557.75,2464.99
  region net GPIO26: 2584.05,2493.24 2584.04,2506.74 2577.75,2504.99 2577.75,2494.99

## Silkscreen, mask and mechanical layers (free items; w line width, h text height)
Top Overlay:
  text "INTV-FUJICard" at 3804.99,2025 h80 r90
Top Solder:
  region net GND: 1505,1859.41 1505,1505.08 3796.33,1505.08 3796.33,1859.41
Bottom Solder:
  region net GND: 1505.08,1859.33 1505.08,1505 3796.41,1505 3796.41,1859.33

## Text inside footprints (layer, text, board x,y; h text height)
GND: Mechanical 1 "TP2T" at 3388.89,2895 h39.37 r90
RX: Mechanical 1 "TP2T" at 3388.86,2734.99 h39.37 r90
SWCLK: Mechanical 1 "TP2T" at 3558.86,2584.99 h39.37 r90
SWD: Mechanical 1 "TP2T" at 3558.86,2734.99 h39.37 r90
TX: Mechanical 1 "TP2T" at 3388.86,2584.99 h39.37 r90